# Altium PCB OpAmp.PcbDoc
Units mm, origin at the board's own origin, x right, y up, seen from the top; angles counter-clockwise.
Board outline 73.75 x 52.75 mm, 2 copper layers (Top Layer, Bottom Layer); 67 components, 63 nets, 246 pads, 122 vias.
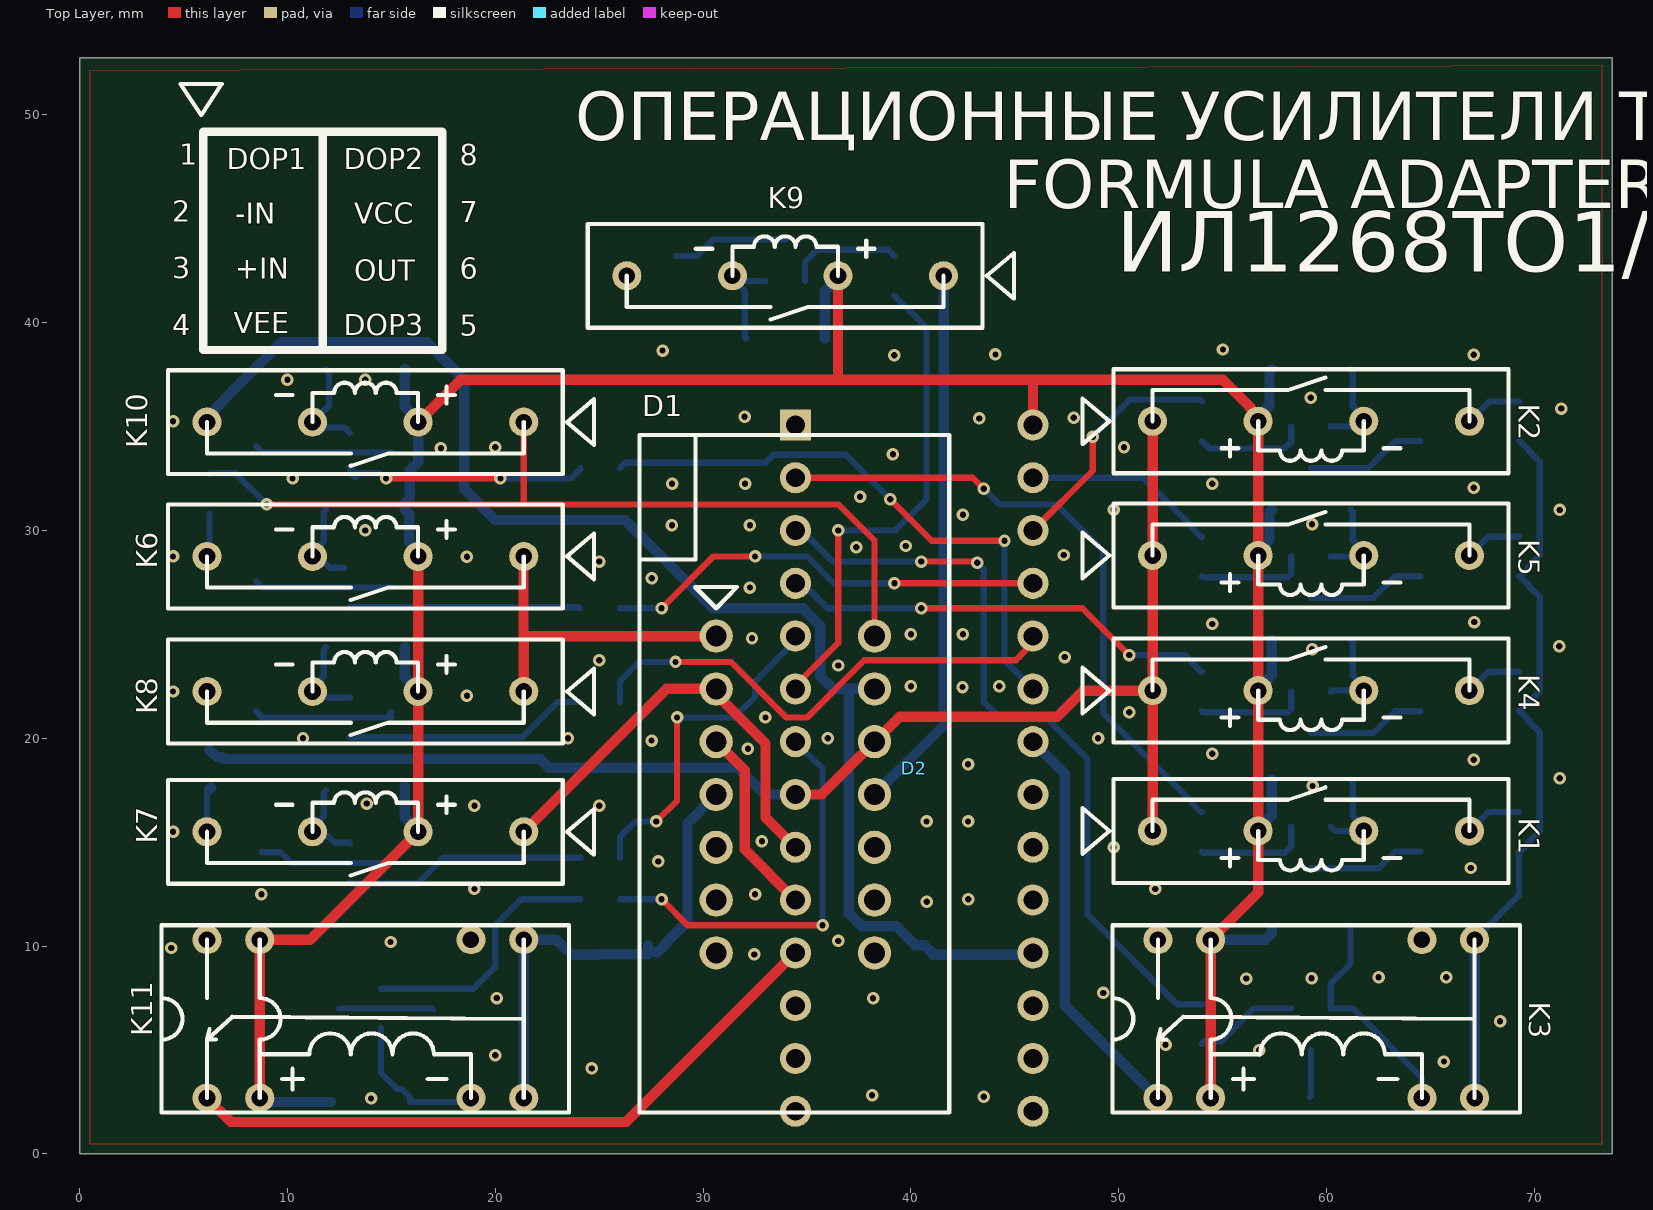
[diagram p0: Top Layer view]
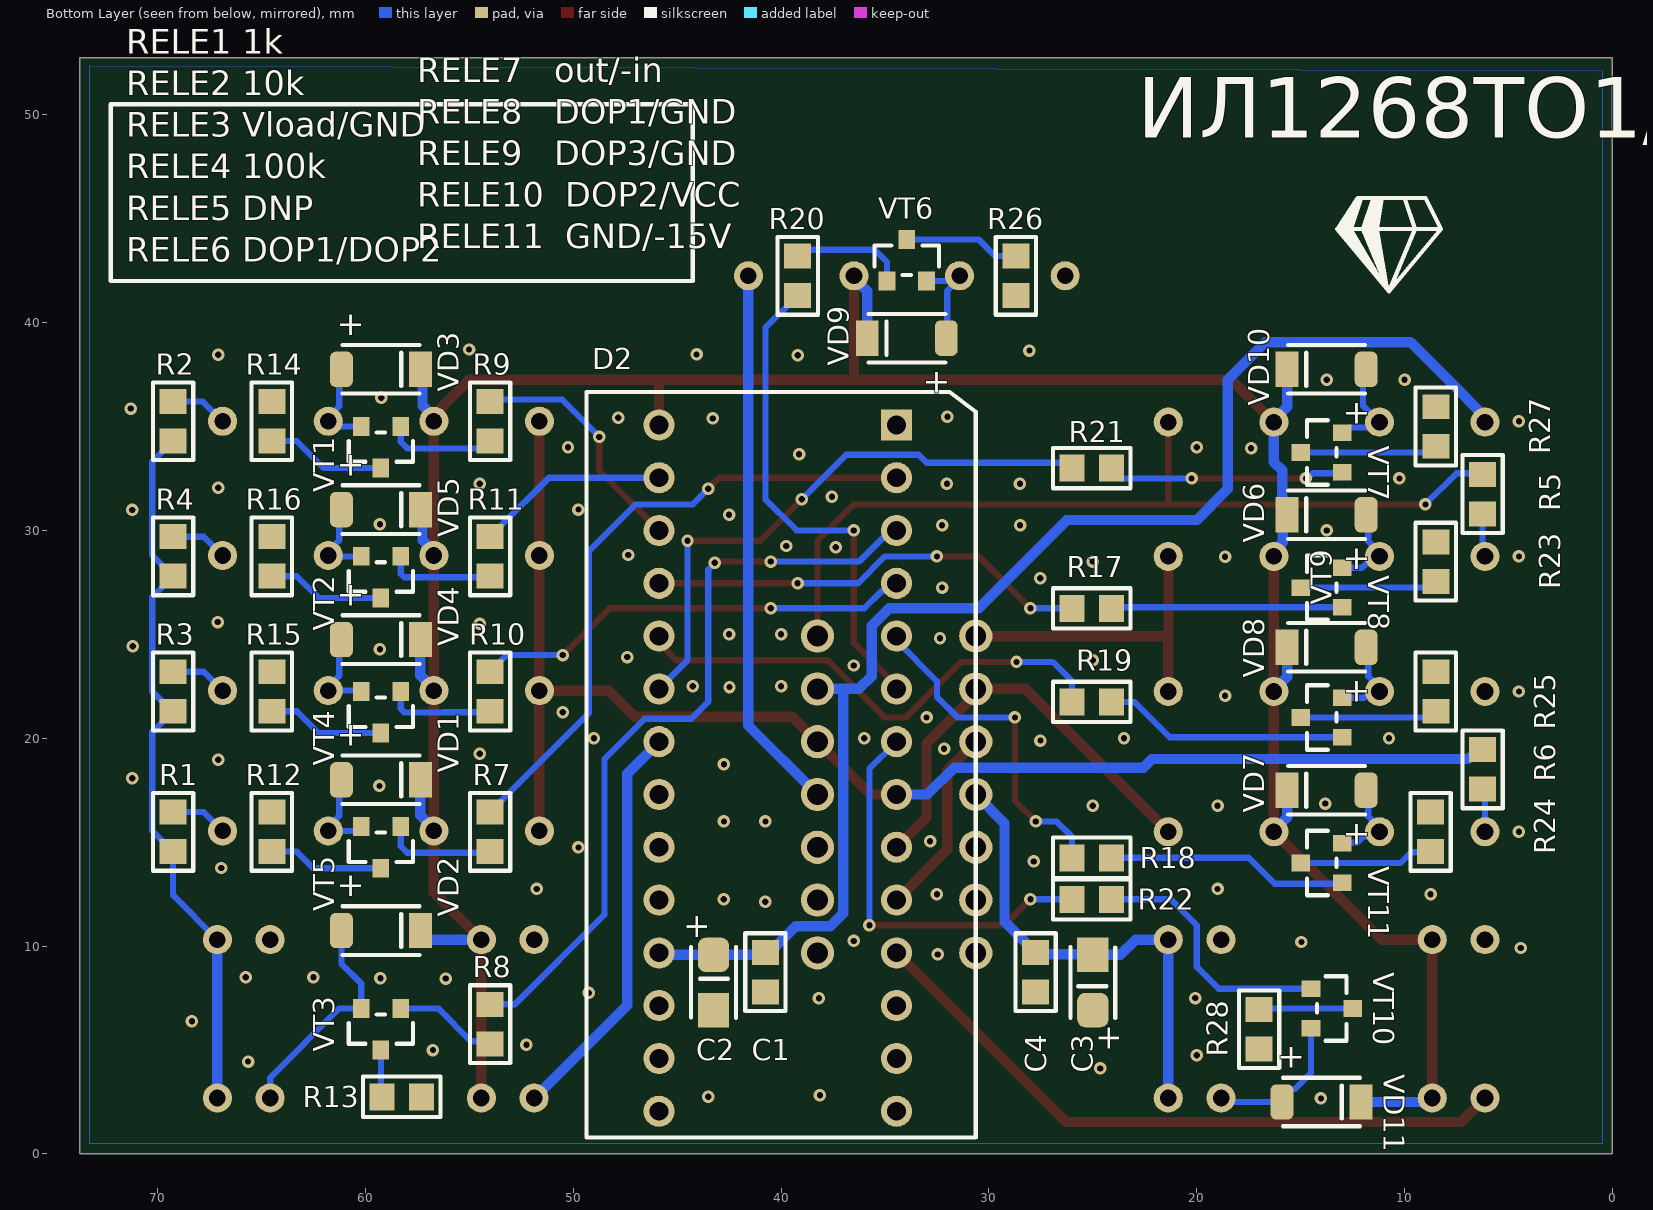
[diagram p1: Bottom Layer view, seen from below]

## Layer stack, top to bottom
Top Solder: solder mask 0.0102, Solder Resist, Dk 3.5
Top Layer: signal copper 0.0356
Dielectric 1: dielectric 0.32, FR-4, Dk 4.8
Bottom Layer: signal copper 0.0356
Bottom Solder: solder mask 0.0102, Solder Resist, Dk 3.5

## Board outline
0,0 73.75,0 73.75,52.75 0,52.75

## Design rules (kind name [scope] priority, off if disabled: settings)
Clearance [All] p1: gap=0.2 ignorepadtopadclearanceinfootprint=FALSE
ComponentClearance [All] p1: gap=0 collisioncheckmode=3 verticalgap=0 showdistances=FALSE
HoleSize [All] p1: absolutevalues=TRUE maxlimit=2.54 minlimit=0.3 maxpercent=80.000 minpercent=20.000
MinimumSolderMaskSliver [All] p1: minsoldermaskwidth=0.2
PolygonConnect [All] p1: connectstyle=Direct reliefconductorwidth=0.254 reliefentries=4 polygonreliefangle="90 Angle" airgapwidth=0.254
RoutingVias [All] p1: holewidth=0.711 width=1.27 viastyle="Through Hole" minholewidth=0.3 minwidth=0.6 maxholewidth=0.711 maxwidth=1.27
SilkToSilkClearance [All] p1: silktosilkclearance=0
SilkToSolderMaskClearance [IsPad] p1: minsilkscreentomaskgap=0 clearancetoexposedcopper=TRUE
SolderMaskExpansion [All] p1: expansion=0.102 istentingtop=FALSE
Width [All] p1: maxlimit=0.5 minlimit=0.25 preferedwidth=0.25
25 further rules are at their usual default settings.

## Components (designator, comment, footprint, x,y, rotation, side; value= is the part's Value field where it differs from the comment)
C1 "10uF" 0805 40.75,8.75 r90 bottom
C2 "4,7uF" "Tantal Case A" 43.25,8.25 r270 bottom
C3 "4,7uF" "Tantal Case A" 25,8.25 r90 bottom
C4 "10uF" 0805 27.75,8.75 r270 bottom
D1 "AD8021ARZ" "DIP 14" 34.441,17.295 r0 top locked
D2 "FORMULA_OP" Formula_OP 40.171,18.565 r0 top locked
K1 "TRR1A05F00" TRR1A05F00 59.245,15.542 r0 top
K2 "TRR1A05F00" TRR1A05F00 59.245,35.25 r0 top
K3 "TRR1C05F00" TRR1С05F00 59.5,6.5 r0 top
K4 "TRR1A05F00" TRR1A05F00 59.245,22.292 r0 top
K5 "TRR1A05F00" TRR1A05F00 59.245,28.792 r0 top
K6 "TRR1A05F00" TRR1A05F00 13.75,28.75 r180 top locked
K7 "TRR1A05F00" TRR1A05F00 13.75,15.5 r180 top
K8 "TRR1A05F00" TRR1A05F00 13.75,22.25 r180 top
K9 "TRR1A05F00" TRR1A05F00 33.95,42.25 r180 top locked
K10 "TRR1A05F00" TRR1A05F00 13.75,35.208 r180 top locked
K11 "TRR1C05F00" TRR1С05F00 13.75,6.5 r0 top
R1 "1k" 0805 69.25,15.5 r270 bottom
R2 "10k" 0805 69.25,35.25 r270 bottom
R3 "100k" 0805 69.25,22.25 r270 bottom
R4 "Don't porpose" 0805 69.25,28.75 r270 bottom
R5 "49.9" 0805 6.25,31.75 r90 bottom
R6 "49.9" 0805 6.25,18.5 r90 bottom
R7 "33k" 0805 54,15.5 r270 bottom
R8 "33k" 0805 54,6.25 r270 bottom
R9 "33k" 0805 54,35.25 r270 bottom
R10 "33k" 0805 54,22.25 r270 bottom
R11 "33k" 0805 54,28.75 r270 bottom
R12 "0" 0805 64.5,15.5 r270 bottom
R13 "0" 0805 58.25,2.75 r0 bottom
R14 "0" 0805 64.5,35.25 r270 bottom
R15 "0" 0805 64.5,22.25 r270 bottom
R16 "0" 0805 64.5,28.75 r270 bottom
R17 "33k" 0805 25.05,26.25 r180 bottom
R18 "33k" 0805 25.05,14.25 r180 bottom
R19 "33k" 0805 25.05,21.75 r180 bottom
R20 "33k" 0805 39.2,42.25 r90 bottom
R21 "33k" 0805 25.05,33 r180 bottom
R22 "33k" 0805 25.05,12.25 r180 bottom
R23 "0" 0805 8.5,28.5 r270 bottom
R24 "0" 0805 8.75,15.5 r270 bottom
R25 "0" 0805 8.5,22.25 r270 bottom
R26 "0" 0805 28.7,42.25 r90 bottom
R27 "0" 0805 8.5,35 r270 bottom
R28 "0" 0805 17,6 r90 bottom
VD1 "LL4148" SOD80C 59.25,18 r180 bottom
VD2 "LL4148" SOD80C 59.25,10.75 r180 bottom
VD3 "LL4148" SOD80C 59.25,37.75 r180 bottom
VD4 "LL4148" SOD80C 59.25,24.75 r180 bottom
VD5 "LL4148" SOD80C 59.25,31 r180 bottom
VD6 "LL4148" SOD80C 13.75,30.75 r0 bottom
VD7 "LL4148" SOD80C 13.75,17.5 r0 bottom
VD8 "LL4148" SOD80C 13.75,24.375 r0 bottom
VD9 "LL4148" SOD80C 33.95,39.25 r0 bottom
VD10 "LL4148" SOD80C 13.75,37.75 r0 bottom
VD11 "LL4148" SOD80C 14,2.5 r180 bottom
VT1 "BC817" SOT-23 59.25,34 r0 bottom
VT2 "BC817" SOT-23 59.25,27.75 r0 bottom
VT3 "BC817" SOT-23 59.25,6 r0 bottom
VT4 "BC817" SOT-23 59.25,21.25 r0 bottom
VT5 "BC817" SOT-23 59.25,14.75 r0 bottom
VT6 "BC817" SOT-23 33.95,43 r180 bottom
VT7 "BC817" SOT-23 14,33.75 r90 bottom
VT8 "BC817" SOT-23 14,27.25 r90 bottom
VT9 "BC817" SOT-23 14,21 r90 bottom
VT10 "BC817" SOT-23 13.5,7 r270 bottom
VT11 "BC817" SOT-23 14,14 r90 bottom

## Footprints (in the part's own frame and the unit in brackets; to place one, negate y for a bottom-side part, rotate by r counter-clockwise, add the part's x,y. Pads: shape width x height; smd on the part's side, far side on the other; paste and mask are expansions set on the pad)
0805 [mm]
  rect 1.2x1.3 smd: 1(-0.95,0) 2(0.95,0)
  silkscreen extent -1.87,-0.97 1.87,0.97, body extent -1.05,-0.63 0.95,0.63, height 0.55
"DIP 14" [mm] "ZIF DIP"
  round 1.6 hole 1: 1(-3.81,7.62) 2(-3.81,5.08) 3(-3.81,2.54) 4(-3.81,0) 5(3.81,0) 6(3.81,2.54) 7(3.81,5.08) 8(3.81,7.62) ""(-3.81,-7.62) ""(-3.81,-5.08) ""(-3.81,-2.54) ""(3.81,-7.62) ""(3.81,-5.08) ""(3.81,-2.54)
  silkscreen extent -7.5,-15.3 7.4,17.3, body extent -8.6,-15.3 7.4,17.9, height 22.85
Formula_OP [mm] "X?"
  rect 1.5x1.5 hole 0.9: 1(-5.73,16.51)
  round 1.5 hole 0.9: 2(-5.73,13.97) 3(-5.73,11.43) 4(-5.73,8.89) 5(-5.73,6.35) 6(-5.73,3.81) 7(-5.73,1.27) 8(-5.73,-1.27) 9(-5.73,-3.81) 10(-5.73,-6.35) 11(-5.73,-8.89) 12(-5.73,-11.43) 13(-5.73,-13.97) 14(-5.73,-16.51) 15(5.7,16.51) 16(5.7,13.97) 17(5.7,11.43) 18(5.7,8.89) 19(5.7,6.35) 20(5.7,3.81) 21(5.7,1.27) 22(5.7,-1.27) 23(5.7,-3.81) 24(5.7,-6.35) 25(5.7,-8.89) 26(5.7,-11.43) 27(5.7,-13.97) 28(5.7,-16.51)
  body extent -7,-17.84 6.94,17.76, height 3
SOD80C [mm]
  rrect50% 1.1x1.7 smd: 1(-1.9,0)
  rect 1.1x1.7 smd: 2(1.9,0)
  silkscreen extent -1.85,-1.17 1.85,1.17, body extent -1.9,-0.8 1.8,0.8, height 1.55
SOT-23 [mm]
  rect 0.8x0.9 smd: 1(-0.95,-1) 1(-0.95,-1) 2(0.95,-1) 2(0.95,-1) 3(0,1) 3(0,1)
  silkscreen extent -1.55,-0.72 1.55,0.7, body extent -1.5,-1.25 1.5,1.25, height 1.05
"Tantal Case A" [mm]
  rrect50% 1.65x1.5 smd: 1(-1.33,0)
  rect 1.65x1.5 smd: 2(1.33,0)
  silkscreen extent -1.71,-1.08 1.7,1.08, body extent -1.89,-0.87 1.51,0.93, height 1.81
TRR1A05F00 [mm]
  round 1.4 hole 0.8: 1(-7.62,0) 3(-2.54,0) 5(2.54,0) 7(7.62,0)
  silkscreen extent -11,-2.5 9.5,2.5, body extent -9.47,-2.64 9.53,2.39, height 7.64
TRR1С05F00 [mm]
  round 1.4 hole 0.8: 1(-7.62,-3.81) 2(-5.08,-3.81) 2(-5.08,3.81) 6(5.08,-3.81) 8(7.62,-3.81) 8(7.62,3.81) 9(5.08,3.81) 14(-7.62,3.81)
  silkscreen extent -9.8,-4.5 9.8,4.5, body extent -9.65,-3.94 9.65,3.94, height 6.77

## Part data
C1 C4: library part "Cap (0805) AVX", ComponentHeigt=1.3, Firme=AVX, KIND=Конденсатор, Leadform=SMD, Packaging=0805
C2 C3: library part "Tantal Case A", ComponentHeigt=1.6, ComponentWeigt=??, Firme=AVX, KIND=Конденсатор, Packaging=R
R1 R2 R3 R4 R5 R6 R7 R8 R9 R10 R11 R17 R18 R19 R20 R21 R22: library part "R0805 Yageo", ComponentHeigt=0.6, Firme=Yageo, KIND=Резистор, Leadform=SMD, Packaging=0805
R12 R13 R14 R15 R16 R23 R24 R25 R26 R27 R28: library part "RC0805 Yageo", ComponentHeigt=0.6, Firme=Yageo, KIND=Резистор, Leadform=SMD, Packaging=0805
VD1 VD2 VD3 VD4 VD5 VD6 VD7 VD8 VD9 VD10 VD11: library part "BAS32L (SOD-80C)"
VT1 VT2 VT3 VT4 VT5 VT6 VT7 VT8 VT9 VT10 VT11: C-E Saturation Voltage=0.7V, C-E Voltage=45V, Collector Current=500mA, DC Current Gain=100…600, Manufacturer=NXP, Total Power Dissipation=250mW, Transition Frequency=100MHz, Working Temperature Max=+150°С, Working Temperature Min=-65°С, Application Category=1, Functional Analog=BC817-40, ID=16, Part Number=BC817, Published=07.05.2013, Publisher="Andrew Danich", Type=Транзистор

## Via types
v1: diameter 0.6, hole 0.3, Top Layer to Bottom Layer, 122 vias

## Nets (pads, with @x,y where several pads share a name; then routed paths per layer and width w, separated by ;. In a path a pad name is that pad's centre, name@x,y a point inside that pad or via, vN(x,y) a via of type N, cw(c..) or ccw(c..) an arc to the next point about the centre after c; other vN are vias at no path point)
+5V: D2.15 K1.3 K2.3 K3.2 K4.3 K5.3 K6.3 K7.3 K8.3 K9.3 K10.3 K11.2 VD1.2 VD2.2 VD3.2 VD4.2 VD5.2 VD6.2 VD7.2 VD8.2 VD9.2 VD10.2 VD11.2 | length 148.6
  Top Layer w0.5: K11.2@8.67,2.69 8.67,10.31 11.1,10.31 K7.3 K8.3 K6.3 ; K10.3 18.332,37.25 36.49,37.25 45.871,37.25 ; K9.3 36.49,37.26 36.5,37.25 ; D2.15 45.871,37.25 ; K3.2@54.42,2.69 54.42,10.31 56.705,12.595 K1.3 K4.3 K5.3 K2.3 56.705,35.494 56.327,35.872 56.327,35.923 55,37.25 45.871,37.25
  Bottom Layer w0.5: K11.2@8.67,2.69 8.914,2.69 9.104,2.5 VD11.2 ; VD7.2@15.65,17.687 15.65,16.209 16.29,15.569 K7.3 ; VD8.2 15.65,22.959 16.29,22.319 K8.3 ; VD6.2@15.65,31 15.854,30.796 15.854,29.43 16.29,28.994 K6.3 ; VD6.2@15.65,31.3 15.89,31.54 15.89,32.891 16.29,33.29 16.29,35.311 15.65,35.951 VD10.2 ; VD9.2 35.85,41.507 36.49,42.147 K9.3 ; K3.2@54.42,10.31 57.05,10.31 57.35,10.61 VD2.2 ; K1.3 56.705,15.64 57.35,16.284 VD1.2 ; K4.3 56.705,22.39 57.35,23.034 VD4.2 ; K5.3 56.705,28.99 57.25,29.534 57.25,30.9 VD5.2 ; K2.3 56.705,35.448 57.25,35.993 57.25,37.65 VD3.2
+in: D1.3 D2.10 | length 9.2
  Top Layer w0.5: D1.3 32,18.466 32,14.656 D2.10
-15V: D2.11 K11.1 | length 32.2
  Top Layer w0.5: K11.1 7.28,1.54 26.306,1.54 D2.11
-in: D1.2 D2.9 K7.1 | length 21.3
  Top Layer w0.5: K7.1 28.245,22.375 D1.2 30.631,22.119 33,19.75 33,16.196 D2.9
Dop1: D1.1 K6.1 K8.1 | length 15.7
  Top Layer w0.5: K6.1@21.359,28.739 21.359,24.944 21.37,24.934 ; K8.1 21.37,24.915 D1.1
Dop2: D1.8 K10.1 R5.2 | length 41.9
  Top Layer w0.3: v1(9,31.25) 21.368,31.25 ; K10.1@21.368,35.206 21.368,31.25 ; D1.8 38.251,29.499 36.5,31.25 21.368,31.25
  Bottom Layer w0.3: R5.2 6.3,32.75 7.5,32.75 v1(9,31.25)
Dop3: D1.5 K9.1 | length 26.3
  Bottom Layer w0.5: D1.5 41.57,20.614 K9.1
GND: C1.1 C2.2 C3.1 C4.2 D2.1 K3.14 K8.7 K9.7 K11.14 R12.1 R13.1 R14.1 R15.1 R16.1 R23.1 R24.1 R25.1 R26.1 R27.1 R28.1
  other v1: 14.028,2.673 43.5,2.75 38.132,2.82 24.648,4.113 65.644,4.446 20,4.75 56.75,5 52.25,5.25 68.343,6.387 20.076,7.497 38.178,7.491 49.25,7.75 56.126,8.438 59.274,8.457 62.5,8.5 65.75,8.5 32.46,9.6 4.415,9.909 14.964,10.197 36.5,10.25 40.755,12.139 42.757,12.254 8.75,12.5 32.5,12.5 19,12.75 51.75,12.75 66.935,13.758 27.839,14.076 49.75,14.75 32.83,15.048 4.5,15.5 40.75,16 42.75,16 19,16.75 25,16.75 13.813,16.86 59.323,17.707 71.219,18.076 42.75,18.75 67.075,18.962 54.5,19.25 32.157,19.491 27.521,19.891 10.75,20 23.5,20 36,20 49,20 33,21 50.5,21.25 18.636,22.042 4.5,22.25 42.48,22.461 40,22.5 44.25,22.5 36.5,23.5 25,23.75 47.395,23.904 59.3,24.288 71.196,24.426 32.352,24.814 40,25 42.5,25 54.5,25.5 67.099,25.589 32.25,27.25 27.528,27.694 25,28.5 4.5,28.75 18.636,28.738 47.357,28.817 37.368,29.186 39.75,29.25 13.75,30 28.5,30.25 32.25,30.25 59.3,30.294 42.5,30.75 71.219,30.984 49.75,31 37.552,31.616 67.075,32.053 28.505,32.25 32.019,32.25 54.5,32.25 10.25,32.5 39.13,33.659 17.386,33.95 20,34 50.25,34 4.5,35.25 43.289,35.385 47.831,35.415 31.998,35.468 71.288,35.862 59.237,36.383 10,37.25 13.75,37.25 39.192,38.432 67.075,38.447 44.066,38.468 28.05,38.652 55.011,38.704
NetK1_5: K1.5 VD1.1 VT5.2 | length 4.4
  Bottom Layer w0.3: VT5.2@60.2,15.75 60.408,15.542 K1.5 61.785,15.732 61.25,16.267 61.25,17.9 VD1.1
NetK1_7: K1.7 R1.1 | length 2.8
  Bottom Layer w0.3: K1.7 67.774,16.45 R1.1
NetK2_5: K2.5 VD3.1 VT1.2 | length 4.5
  Bottom Layer w0.3: VT1.2@60.2,35 61.238,35 61.488,35.25 K2.5 61.785,35.44 61.25,35.976 61.25,37.65 VD3.1
NetK2_7: K2.7 R2.1 | length 2.8
  Bottom Layer w0.3: K2.7 67.815,36.2 R2.1
NetK3_6: K3.6 VD2.1 VT3.2 | length 10.9
  Bottom Layer w0.3: VD2.1 61.15,9.15 60.2,8.2 60.2,7 61.25,7 64.58,3.67 K3.6
NetK3_8: K3.8 R1.2 R2.2 R3.2 R4.2 | length 35.1
  Bottom Layer w0.3: K3.8@67.12,10.31 69.25,12.44 R1.2 69.3,14.55 69.75,15 69.75,15.05 70.25,15.55 70.25,20.3 69.75,20.8 69.75,20.85 R3.2@69.3,21.3 ; R3.2 R3.2@69.3,21.3 ; R4.2 R4.2@69.3,27.8 ; R2.2 69.3,34.3 69.75,33.85 69.75,33.8 70.25,33.3 70.25,28.8 69.75,28.3 69.75,28.25 R4.2@69.3,27.8 ; R3.2@69.3,21.3 70.25,22.25 70.25,26.8 69.75,27.3 69.75,27.35 R4.2@69.3,27.8
  Bottom Layer w0.5: K3.8@67.12,2.69 K3.8@67.12,10.31
NetK4_5: K4.5 VD4.1 VT4.2 | length 4.3
  Bottom Layer w0.3: VT4.2@60.2,22.25 60.242,22.292 K4.5 61.785,22.482 61.25,23.017 61.25,24.65 VD4.1
NetK4_7: K4.7 R3.1 | length 2.8
  Bottom Layer w0.3: K4.7 67.774,23.2 R3.1
NetK5_5: K5.5 VD5.1 VT2.2 | length 4.1
  Bottom Layer w0.3: VT2.2@60.2,28.75 61.744,28.75 K5.5 61.785,28.982 61.25,29.517 61.25,30.9 VD5.1
NetK5_7: K5.7 R4.1 | length 2.8
  Bottom Layer w0.3: K5.7 67.774,29.7 R4.1
NetK6_5: K6.5 VD6.1 VT8.2 | length 4.3
  Bottom Layer w0.3: VD6.1@11.85,31 11.75,30.9 11.75,29.476 11.21,28.936 K6.5 11.495,28.75 12.045,28.2 VT8.2@12.75,28.2
NetK6_7: K6.7 R5.1 | length 2.1
  Bottom Layer w0.3: K6.7 6.25,28.87 R5.1
NetK7_5: K7.5 VD7.1 VT11.2 | length 4.3
  Bottom Layer w0.3: VD7.1 11.75,17.4 11.75,16.25 11.21,15.71 K7.5 11.42,15.29 11.96,15.29 12.276,14.974 12.976,14.974 VT11.2@13,14.95
NetK7_7: K7.7 R6.1 | length 2.2
  Bottom Layer w0.3: K7.7 6.13,17.43 R6.1
  Bottom Layer w0.5: R6.1 R6.1@6.33,17.63
NetK8_5: K8.5 VD8.1 VT9.2 | length 4.3
  Bottom Layer w0.3: VD8.1 11.75,24.275 11.75,22.976 11.21,22.436 K8.5 11.42,22.04 11.846,22.04 11.936,21.95 VT9.2@13,21.95
NetK9_5: K9.5 VD9.1 VT6.2 | length 5
  Bottom Layer w0.3: VD9.1 32,39.3 32,41.524 31.41,42.114 K9.5 31.708,42.25 31.958,42 VT6.2@33,42
NetK10_5: K10.5 VD10.1 VT7.2 | length 4.9
  Bottom Layer w0.3: VD10.1 12,37.6 12,35.998 K10.5 11.508,35.208 11.766,34.95 12.75,34.95 VT7.2@13,34.7
NetK11_6: K11.6 VD11.1 VT10.2 | length 7.3
  Bottom Layer w0.3: VT10.2@14.5,6.05 14.5,3.9 15.277,3.123 15.51,3.123 15.9,2.732 VD11.1 18.64,2.5 K11.6
NetR7_2: R7.2 VT5.1 | length 5.4
  Bottom Layer w0.3: R7.2 54.058,14.492 57.992,14.492 58.3,14.8 VT5.1@58.3,15.75
NetR8_2: R8.2 VT3.1 | length 5
  Bottom Layer w0.3: R8.2 54.124,5.424 54.924,5.424 56.5,7 VT3.1@58.3,7
NetR9_2: R9.2 VT1.1 | length 5.3
  Bottom Layer w0.3: R9.2 54.357,33.943 57.983,33.943 58.3,34.26 VT1.1@58.3,35
NetR10_2: R10.2 VT4.1 | length 5.2
  Bottom Layer w0.3: R10.2 54.05,21.25 56.262,21.25 56.27,21.242 58.124,21.242 58.3,21.417 VT4.1@58.3,22.25
NetR11_2: R11.2 VT2.1 | length 5.2
  Bottom Layer w0.3: R11.2 54.058,27.742 58.124,27.742 58.3,27.917 VT2.1@58.3,28.75
NetR12_2: R12.2 VT5.3 | length 5.6
  Bottom Layer w0.3: VT5.3@59.25,13.75 62.5,13.75 63.3,14.55 R12.2
NetR13_2: R13.2 VT3.3 | length 2.3
  Bottom Layer w0.3: R13.2 59.25,2.8 VT3.3@59.25,5
NetR14_2: R14.2 VT1.3 | length 5.8
  Bottom Layer w0.3: VT1.3@59.25,33 62,33 63.3,34.3 R14.2
NetR15_2: R15.2 VT4.3 | length 5.7
  Bottom Layer w0.3: VT4.3@59.25,20.25 62.25,20.25 63.3,21.3 R15.2
NetR16_2: R16.2 VT2.3 | length 5.7
  Bottom Layer w0.3: VT2.3@59.25,26.75 62.25,26.75 63.3,27.8 R16.2
NetR17_2: R17.2 VT8.1 | length 11.1
  Bottom Layer w0.3: VT8.1@13,26.3 24,26.3 R17.2@24.05,26.25
NetR18_2: R18.2 VT11.1 | length 11.6
  Bottom Layer w0.3: VT11.1@13,13.05 13.05,13 16.25,13 17.5,14.25 R18.2
NetR19_2: R19.2 VT9.1 | length 11.8
  Bottom Layer w0.3: VT9.1@13,20.05 21.3,20.05 23,21.75 R19.2
NetR20_2: R20.2 VT6.1 | length 5.6
  Bottom Layer w0.3: VT6.1@34.9,42 34.9,42.9 35.5,43.5 38.9,43.5 R20.2
NetR21_2: R21.2 VT7.1 | length 12.2
  Top Layer w0.3: v1(14.75,32.5) v1(20.25,32.5)
  Bottom Layer w0.3: VT7.1@13,33.05 VT7.1@13.154,32.896 ; VT7.1@13.077,32.723 VT7.1@13.173,32.627 ; VT7.1@13.223,32.627 VT7.1@13.3,32.55 ; VT7.1@13.25,32.704 VT7.1@13.154,32.8 ; v1(14.75,32.5) 14.672,32.5 14.424,32.747 13.207,32.747 VT7.1@13.154,32.8 ; v1(20.25,32.5) 23.65,32.5 24.1,32.95 R21.2 ; VT7.1@13.154,32.8 13,32.8 VT7.1@13.154,32.8
NetR22_2: R22.2 VT10.1 | length 12.6
  Bottom Layer w0.3: VT10.1@14.5,7.95 14.55,7.95 18.95,7.95 20,9 20,11 21.25,12.25 R22.2
NetR23_2: R23.2 VT8.3 | length 6.6
  Bottom Layer w0.3: R23.2 8.8,27.25 VT8.3@15,27.25
NetR24_2: R24.2 VT11.3 | length 6.5
  Bottom Layer w0.3: R24.2 8.781,14.519 9.674,14.519 10.193,14 VT11.3@15,14
NetR25_2: R25.2 VT9.3 | length 6.7
  Bottom Layer w0.3: R25.2 8.8,21 VT9.3@15,21 ; VT9.3@14.95,21.2 VT9.3@15,21.25
NetR26_2: R26.2 VT6.3 | length 5.6
  Bottom Layer w0.3: R26.2 29.7,43.2 30.5,44 VT6.3@33.95,44
NetR27_2: R27.2 VT7.3 | length 6.6
  Bottom Layer w0.3: R27.2 8.8,33.75 VT7.3@15,33.75
NetR28_2: R28.2 VT10.3 | length 4.5
  Bottom Layer w0.3: VT10.3@12.5,7 16.95,7 R28.2
out: D1.6 D2.8 K1.1 K2.1 K4.1 K5.1 R6.2 | length 68
  Top Layer w0.5: D2.8 35.711,17.295 39.451,21.035 47.035,21.035 48.292,22.292 K4.1 ; K1.1 K4.1 ; K2.1 K5.1 K4.1
  Bottom Layer w0.5: R6.2 6.6,19.1 6.843,19.1 6.943,19 22.162,19 22.577,18.585 31.665,18.585 32.955,17.295 D2.8
U1: D2.2 R7.1 | length 30.8
  Top Layer w0.3: D2.2 42.971,32.535 43.5,32.006 v1(43.5,32)
  Bottom Layer w0.3: v1(43.5,32) 44.25,31.25 47,31.25 49.25,29 49.25,21.2 53.5,16.95 53.5,16.9 53.95,16.45 R7.1
U2: D2.16 R11.1 | length 9.3
  Bottom Layer w0.3: D2.16 51.165,32.535 53.5,30.2 53.5,30.15 53.95,29.7 R11.1
U3: D2.3 R8.1 | length 37.1
  Top Layer w0.3: v1(40.5,28.5) 43.135,28.5 v1(43.193,28.443)
  Bottom Layer w0.3: D2.3 34.755,29.995 36.25,28.5 v1(40.5,28.5) ; v1(43.193,28.443) 43.193,28.424 43.5,28.117 43.5,21.75 44.315,20.935 46.565,20.935 48.5,19 48.5,11.5 52.8,7.2 R8.1
U4: D2.17 R9.1 | length 11.7
  Top Layer w0.3: D2.17 48.75,32.874 v1(48.75,34.5)
  Bottom Layer w0.3: v1(48.75,34.5) 50.55,36.3 53.9,36.3 R9.1
U5: D2.4 R10.1 | length 21.4
  Top Layer w0.3: v1(40.5,26.25) 48.25,26.25 v1(50.5,24)
  Bottom Layer w0.3: D2.4 34.766,27.455 35.137,27.083 35.167,27.083 36,26.25 v1(40.5,26.25) ; v1(50.5,24) 53.2,24 53.5,23.7 53.5,23.65 53.95,23.2 R10.1
U6: D2.18 R17.1 | length 21.4
  Top Layer w0.3: v1(28,26.25) 30.5,28.75 v1(32.5,28.75) ; v1(39.205,27.455) D2.18
  Bottom Layer w0.3: R17.1 v1(28,26.25) ; v1(32.5,28.75) 35,28.75 36.295,27.455 v1(39.205,27.455)
U7: D2.5 R18.1 | length 16.4
  Top Layer w0.3: v1(27.75,16) 28.75,17 v1(28.75,21)
  Bottom Layer w0.3: R18.1 26,15.25 26.75,16 v1(27.75,16) ; v1(28.75,21) 31.5,21 32.5,22 32.5,22.75 34.441,24.691 D2.5
U8: D2.19 R19.1 | length 24.2
  Top Layer w0.3: v1(28.672,23.672) 31.328,23.672 34,21 35,21 37.75,23.75 45.052,23.75 45.271,23.969 45.271,23.99 45.871,24.59 D2.19
  Bottom Layer w0.3: R19.1 26,22.75 26.922,23.672 v1(28.672,23.672)
U9: D2.6 R20.1 | length 23.8
  Top Layer w0.3: D2.6 34.441,22.529 36.5,24.588 v1(36.5,30)
  Bottom Layer w0.3: v1(36.5,30) 39.25,30 40.75,31.5 40.75,39.75 R20.1
U10: D2.20 R21.1 | length 28.2
  Top Layer w0.3: v1(39,31.5) 41,29.5 v1(44.5,29.5)
  Bottom Layer w0.3: R21.1 26.25,33.25 33,33.25 33.385,33.635 36.865,33.635 v1(39,31.5) ; v1(44.5,29.5) 44.5,23.746 D2.20
U11: D2.7 R22.1 | length 19.6
  Top Layer w0.3: v1(28,12.25) 29.25,11 v1(35.75,11)
  Bottom Layer w0.3: R22.1 v1(28,12.25) ; D2.7 35.75,18.526 v1(35.75,11)
Vcc: C1.2 C2.1 D1.7 D2.25 K10.7 | length 65.7
  Bottom Layer w0.5: K10.7 6.13,35.452 6.526,35.848 6.526,35.863 7.4,36.736 9.714,39.05 16.7,39.05 18.5,37.25 18.5,32 20,30.5 26.25,30.5 30.495,26.255 34.792,26.255 34.932,26.115 34.938,26.115 35.641,25.412 35.641,22.984 36.25,22.375 37,22.375 ; D1.7 37,22.375 ; C1.2@41,9.7 40.65,10.05 40.2,10.05 39.285,10.965 37.624,10.965 37,11.589 37,22.375 ; C1.2@41.07,9.58 45.776,9.58 D2.25
Vee: C3.2 C4.1 D1.4 K11.8 | length 23.2
  Bottom Layer w0.5: K11.8@21.37,2.69 21.37,10.31 22.94,10.31 23.67,9.58 C3.2 25.02,9.6 27.35,9.6 C4.1@27.35,10.05 ; C4.1 27.8,9.7 28.15,10.05 28.15,10.1 29.25,11.2 29.25,15.914 D1.4
Vload: D2.21 K3.1 | length 19.6
  Bottom Layer w0.5: D2.21 47.406,18.3 47.406,7.164 K3.1
pads on no net: D1. D2.12 D2.13 D2.14 D2.22 D2.23 D2.24 D2.26 D2.27 D2.28 K3.9 K11.9

## Polygon pours and split planes (outlines as drawn)
GND on Top Layer "NONET_L-01_P-001" (solid, remove dead copper, shelved, pour order 2): 0.5,52.122 0.5,0.5 73.25,0.5 73.25,52.365
GND on Bottom Layer "NONET_L-01_P-001" (solid, remove dead copper, shelved, pour order 3): 0.5,52.122 0.5,0.5 73.25,0.5 73.25,52.365

## Other copper
Bottom Layer:
  pour cut-out: 14.5,33.25 14.5,31.5 15.75,31.5 15.75,33.25
  pour cut-out: 16.23,23.325 16.23,22.485 16.4,22.485 16.4,23.325

## Silkscreen, mask and mechanical layers (free items; w line width, h text height)
Top Overlay:
  lines w0.2: 4.85,51.483 6.85,51.483 5.85,49.983 4.85,51.483
  lines w0.4: 11.7,38.683 11.7,49.183 ; 5.95,38.683 5.95,48.683 5.95,49.183 17.45,49.183 17.45,48.583 17.45,38.683 5.95,38.683
  text "ОПЕРАЦИОННЫЕ УСИЛИТЕЛИ ТИП 1" at 23.854,48 h4
  text "1" at 4.792,47.583 h1
  text "8" at 18.296,47.559 h1
  text "DOP1" at 7.084,47.383 h1
  text "DOP2" at 12.72,47.383 h1
  text "2" at 4.459,44.853 h1
  text "7" at 18.296,44.828 h1
  text "-IN" at 7.5,44.75 h1
  text "VCC" at 13.22,44.75 h1
  text "FORMULA ADAPTER" at 44.46,44.739 h4
  text "3" at 4.459,42.122 h1
  text "+IN" at 7.5,42.117 h1
  text "6" at 18.296,42.097 h1
  text "OUT" at 13.22,42.014 h1
  text "ИЛ1268ТО1/1" at 49.888,41.484 h5
  text "VEE" at 7.417,39.483 h1
  text "4" at 4.459,39.391 h1
  text "DOP3" at 12.72,39.381 h1
  text "5" at 18.296,39.366 h1
Bottom Overlay:
  region: 12,44.5 11.25,44.5 11,46 11.5,46
  region: 12.5,44.5 13.25,44.5 12.25,46 12,46
  region: 10.75,41.5 11.25,44.5 12,44.5
  region: 13.25,44.5 10.75,41.5 12.5,44.5
  lines w0.2: 10,46 9.5,44.5 10.75,41.5 ; 11.5,46 12,44.5 10.75,41.5 ; 8.25,44.5 10.75,41.5 ; 8.25,44.5 9,46 12.25,46 13.25,44.5 ; 8.25,44.5 13.25,44.5 ; 10.75,41.5 13.25,44.5 ; 44.25,42 44.25,50.5 72.25,50.5 72.25,42 44.25,42
  text "ИЛ1268ТО1/1" at 22.862,47.919 h5
  text "RELE7   out/-in / RELE8   DOP1/GND / RELE9   DOP3/GND / RELE10  DOP2/VCC / RELE11  GND/-15V" at 57.5,43.187 h2
  text "RELE1 1k / RELE2 10k / RELE3 Vload/GND / RELE4 100k / RELE5 DNP / RELE6 DOP1/DOP2" at 71.5,42.548 h2
Board:
  the board outline again, w0.2

## Text inside footprints (layer, text, board x,y; h text height)
C2: Bottom Overlay "+" at 44.913,11.613 h2 r90
C3: Bottom Overlay "+" at 23.337,4.887 h2 r270
D2: Mechanical 1 "2" at 45.025,36.569 h0.79 r270; Mechanical 1 "1" at 33.638,36.482 h0.79 r270
VD1: Bottom Overlay "+" at 61.365,19.252 h2
VD2: Bottom Overlay "+" at 61.365,12.002 h2
VD3: Bottom Overlay "+" at 61.365,39.002 h2
VD4: Bottom Overlay "+" at 61.365,26.002 h2
VD5: Bottom Overlay "+" at 61.365,32.252 h2
VD6: Bottom Overlay "+" at 11.635,29.498 h2 r180
VD7: Bottom Overlay "+" at 11.635,16.248 h2 r180
VD8: Bottom Overlay "+" at 11.635,23.123 h2 r180
VD9: Bottom Overlay "+" at 31.835,37.998 h2 r180
VD10: Bottom Overlay "+" at 11.635,36.498 h2 r180
VD11: Bottom Overlay "+" at 16.115,3.752 h2